# Altium PCB Stepper Board-v1.0.PcbDoc (part 6 of 8)
Units mil, origin at the board's own origin, x right, y up, seen from the top; angles counter-clockwise.
Board outline 6225.19 x 6531 mil, 4 copper layers (Top Layer, Layer-1, Layer-2, Bottom Layer), stack 61.654 mil thick; 410 components, 372 nets, 1464 pads, 1083 vias.
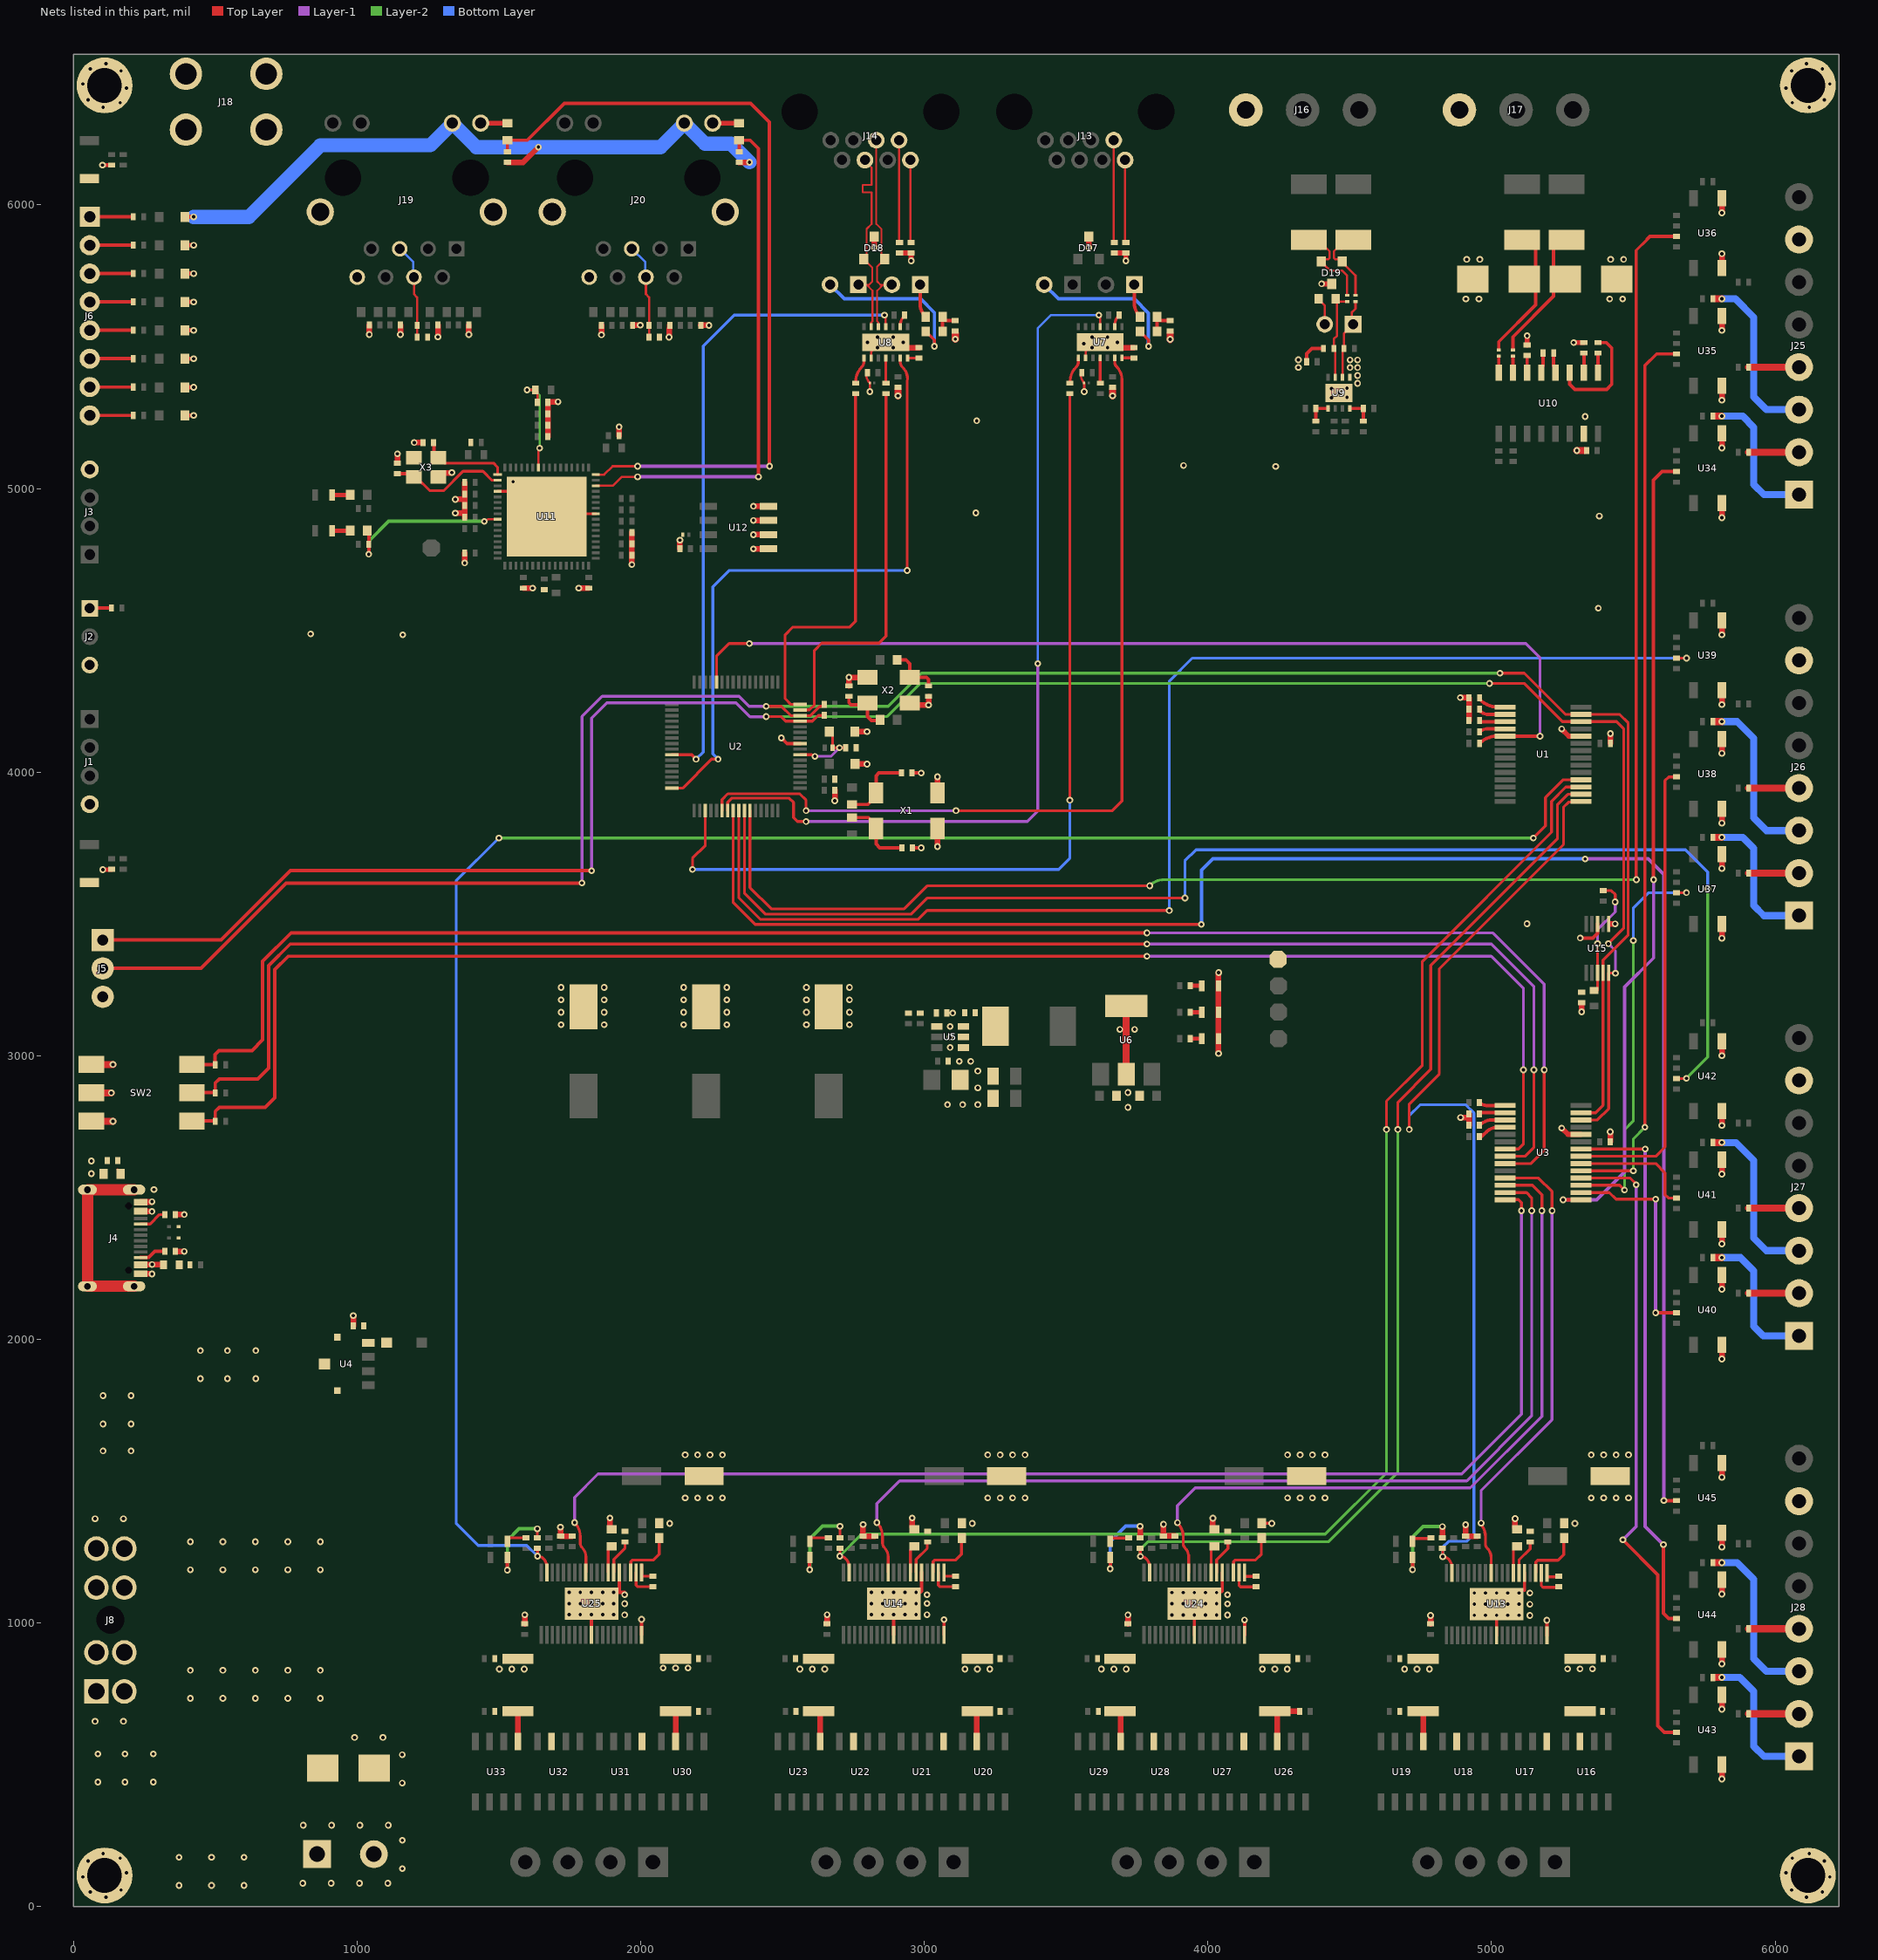
[diagram p5: the nets of this part, all layers, seen from the top]

## Via types
v1: diameter 23.62, hole 11.81, Top Layer to Bottom Layer, 1081 vias
v2: diameter 23.62, hole 11.81, Top Layer to Bottom Layer, tented both sides, 2 vias

## Nets (pads, with @x,y where several pads share a name; then routed paths per layer and width w, separated by ;. In a path a pad name is that pad's centre, name@x,y a point inside that pad or via, vN(x,y) a via of type N, cw(c..) or ccw(c..) an arc to the next point about the centre after c; other vN are vias at no path point) (continued)
CAN1_TX: R45.2 U2.51 | length 3211.9
  Top Layer w10: v1(2182.45,3657) 2182.45,3696.46 2227.73,3741.73 U2.51@2227.73,3864.63 ; v1(3513,3901) R45.2@3513,5334.77
  Bottom Layer w10: v1(2182.45,3657) 3474,3657 3513,3696 v1(3513,3901)
CAN2_N: D18.2 J12.2 J14.5 U8.12 | length 736.2
  Top Layer w6.5: 2830.57,6107.49 J14.5@2830.57,6228.51
  Top Layer w6.66: 2830.65,6107.41 2830.65,5933 2849.12,5914.53 D18.2@2849.12,5820.54 ; U8.12@2838.32,5570.61 2838.32,5585.75 2833.76,5590.31 2833.76,5698.11 2854.64,5718.98 ; D18.2@2849.98,5820.54 D18.2@2860.91,5809.61 2833.16,5781.87 2833.16,5730.94 2845.12,5718.98 2854.64,5718.98 ; J12.2@2884.36,5718.98 2854.64,5718.98
CAN2_P: D18.1 J11.1 J14.4 U8.13 | length 736.2
  Top Layer w6.5: J14.4@2790.53,6155.47 2814.07,6131.93 2814.07,6107.49
  Top Layer w6.66: J11.1@2766.5,5718.98 J11.1@2796.22,5718.98 ; D18.1@2796.17,5820.54 2796.17,5915.18 2813.99,5933 2813.99,6041 2813.99,6044.33 2782.5,6044.33 2782.5,6071 2813.99,6071 2813.99,6089 2813.99,6107.41 ; D18.1@2797.03,5820.54 D18.1@2786.1,5809.61 2816.5,5779.22 2816.5,5729.74 2805.75,5718.98 J11.1@2796.22,5718.98 ; U8.13@2812.73,5570.61 2812.73,5585.75 2817.1,5590.12 ; 2817.1,5590.17 ccw(c2833.76,5590.31) 2817.1,5590.12 ; J11.1@2796.22,5718.98 2817.1,5698.11 2817.1,5590.12
CAN2_RX: R46.2 U2.15 | length 1373.8
  Top Layer w10: U2.15@2562.37,4218.95 2563.28,4219.86 2594.86,4219.86 2612,4237 2612,4429 2638,4455 2840,4455 2864.92,4479.92 R46.2@2864.92,5330.63
CAN2_TX: R47.2 U2.16 | length 1353.9
  Top Layer w10: U2.16@2562.37,4238.64 2529.36,4238.64 2509,4259 2509,4485 2535,4511 2736,4511 2757.02,4532.02 R47.2@2757.02,5330.63
"CHASIS GND": "J19.Shield 1" "J19.Shield 2" "J20.Shield 1" "J20.Shield 2" J18.1 J19.8 J20.8 pad.MH1
  other v1: 114.33,32.27 6110.86,32.27 58.42,51.29 6166.77,51.29 167.31,58.36 6057.88,58.36 32.33,104.27 6192.86,104.27 186.3,118.67 6038.89,118.67 51.35,160.18 6173.84,160.18 164.24,170.25 6060.95,170.25 104.33,186.27 6120.86,186.27 104.33,6344.73 6120.86,6344.73 164.24,6360.75 6060.95,6360.75 51.35,6370.82 6173.84,6370.82 186.3,6412.33 6038.89,6412.33 32.33,6426.73 6192.86,6426.73 167.31,6472.64 6057.88,6472.64 58.42,6479.71 6166.77,6479.71 114.33,6498.73 6110.86,6498.73
DIR+_1: J25.4 NT18.2 | length 177.5
  Top Layer w25: NT18.2@5906.89,5428.29 J25.4@6084.39,5428.29
DIR+_2: J27.4 NT24.2 | length 177.5
  Top Layer w25: NT24.2@5906.89,2462.63 J27.4@6084.39,2462.63
DIR+_3: J26.4 NT21.2 | length 177.5
  Top Layer w25: NT21.2@5906.89,3943.96 J26.4@6084.39,3943.96
DIR+_4: J28.4 NT27.2 | length 177.5
  Top Layer w25: NT27.2@5906.89,979.29 J28.4@6084.39,979.29
DIR-1: U3.25 U13.11 | length 1644.9
  Top Layer w10: v1(4963.12,1352.02) 4962.91,1352.02 4960.68,1349.79 cw(c4909.76,1303.25) 4978.74,1303.25 4978.74,1278.22 ccw(c4998.92,1278.22) 4984.65,1263.95 cw(c4951.4,1230.7) 4998.43,1230.7 U13.11@4998.43,1176.5 ; U3.25@5047.97,2568.73 5166.28,2568.73 5213.64,2521.36 v1(5213.64,2453.29)
  Layer-1 w10: v1(4963.12,1352.02) 4963.12,1466.12 5213.64,1716.64 v1(5213.64,2453.29)
DIR-2: U3.26 U24.11 | length 2586.8
  Top Layer w10: v1@3892.57,1353.32 cw(c3843.76,1304.57) 3912.74,1304.57 3912.74,1279.55 ccw(c3932.92,1279.55) 3918.65,1265.28 cw(c3885.4,1232.02) 3932.43,1232.02 U24.11@3932.43,1177.82 ; U3.26@5047.97,2543.13 5143.87,2543.13 5177.67,2509.33 v1(5177.67,2453.29)
  Layer-1 w10: v1(3892.54,1353.35) 3892.54,1413.54 3955,1476 4925,1476 5177.67,1728.67 5177.67,2451.33 v1@5176,2453
DIR-3: U3.27 U14.11 | length 3560.7
  Top Layer w10: v1@2832.57,1353.97 cw(c2783.76,1305.23) 2852.74,1305.23 2852.74,1280.2 ccw(c2872.92,1280.2) 2858.65,1265.93 cw(c2825.4,1232.67) 2872.43,1232.67 U14.11@2872.43,1178.47 ; U3.27@5047.97,2517.54 5123.46,2517.54 5141.69,2499.31 v1(5141.69,2453.29)
  Layer-1 w10: v1(2832.54,1354) 2832.54,1420.39 2913.15,1501 4913,1501 5141.69,1729.69 v1(5141.69,2453.29)
DIR-4: U3.28 U25.11 | length 4543.7
  Top Layer w10: v1@1766.57,1353.97 cw(c1717.76,1305.23) 1786.74,1305.23 1786.74,1280.2 ccw(c1806.92,1280.2) 1792.65,1265.93 cw(c1759.4,1232.67) 1806.43,1232.67 U25.11@1806.43,1178.47 ; U3.28@5047.97,2491.95 5049.02,2493 5095,2493 5105.71,2482.29 v1(5105.71,2453.29)
  Layer-1 w10: v1(1766.54,1354) 1766.54,1442.54 1849,1525 4895.6,1525 5106,1735.4 v1@5106,2452
DIR-_1: J25.3 R139.2 | length 620.9
  Top Layer w25: 5789.89,5668.79 v1(5812.39,5668.79)
  Bottom Layer w25: v1(5812.39,5668.79) 5860.21,5668.79 5925,5604 5925,5323 5969.71,5278.29 J25.3@6084.39,5278.29
DIR-_2: J27.3 R157.2 | length 612.9
  Top Layer w25: 5789.89,2693.96 v1(5812.39,2693.96)
  Bottom Layer w25: v1(5812.39,2693.96) 5862.22,2693.96 5925,2631.18 5925,2357.33 5969.71,2312.63 J27.3@6084.39,2312.63
DIR-_3: J26.3 R142.2 | length 616.1
  Top Layer w25: 5789.89,4178.29 v1(5812.39,4178.29)
  Bottom Layer w25: v1@5814.59,4178.29 5866.38,4178.29 5925,4119.67 5925,3838.67 5969.71,3793.96 J26.3@6084.39,3793.96
DIR-_4: J28.3 R160.2 | length 617.1
  Top Layer w25: 5789.89,1212.63 v1(5812.39,1212.63)
  Bottom Layer w25: v1(5812.39,1212.63) 5866.05,1212.63 5925,1153.68 5925,874 5969.71,829.29 J28.3@6084.39,829.29
EN_CAN: U2.54 U7.6 | length 3086.9
  Top Layer w10: U2.54@2286.79,3864.63 2286.79,3903.23 2307.24,3923.68 2560.32,3923.68 2583,3901 v1(2583,3864.11) ; v1(3111.62,3864.11) 3663.11,3864.11 3696.77,3897.77 3696.77,5385.69 ccw(c3636.67,5385.69) 3679.17,5428.19 cw(c3698.46,5447.47) 3671.18,5447.47 U7.6@3671.18,5460.58
  Layer-1 w10: v1(2583,3864.11) v1(3111.62,3864.11)
EN_CAN_2: U2.48 U8.6 | length 2283.2
  Top Layer w10: U2.48@2109.63,3943.36 2147.55,3943.36 2249.82,4045.63 v1(2273,4045.63) ; U8.6@2915.1,5460.37 2915.1,5447.27 ccw(c2942.37,5447.27) 2923.08,5427.98 cw(c2880.59,5385.48) 2940.69,5385.48 ; v1(2939.28,4711) 2939.28,5381.55
  Bottom Layer w10: v1(2273,4045.63) 2253.98,4064.65 2253.98,4653.98 2311,4711 v1(2939.28,4711)
ENA+_1: J25.2 NT17.2 | length 177.5
  Top Layer w25: NT17.2@5906.89,5128.29 J25.2@6084.39,5128.29
ENA+_2: J27.2 NT23.2 | length 177.5
  Top Layer w25: NT23.2@5906.89,2162.63 J27.2@6084.39,2162.63
ENA+_3: J26.2 NT20.2 | length 177.5
  Top Layer w25: NT20.2@5906.89,3643.96 J26.2@6084.39,3643.96
ENA+_4: J28.2 NT26.2 | length 177.5
  Top Layer w25: NT26.2@5906.89,679.29 J28.2@6084.39,679.29
ENA-_1: J25.1 R138.2 | length 527.6
  Top Layer w25: 5789.89,5255.29 v1(5812.39,5255.29)
  Bottom Layer w25: v1(5812.39,5255.29) 5885.71,5255.29 5925,5216 5925,5014 5960.71,4978.29 J25.1@6084.39,4978.29
ENA-_2: J27.1 R156.2 | length 523.4
  Top Layer w25: 5789.89,2287.96 v1(5812.39,2287.96)
  Bottom Layer w25: v1(5812.39,2287.96) 5878.68,2287.96 5925,2241.64 5925,2045.5 5957.87,2012.63 J27.1@6084.39,2012.63
ENA-_3: J26.1 R141.2 | length 527.3
  Top Layer w25: 5789.89,3770.29 v1(5812.39,3770.29)
  Bottom Layer w25: v1(5812.39,3770.29) 5886.38,3770.29 5925,3731.67 5925,3529.67 5960.71,3493.96 J26.1@6084.39,3493.96
ENA-_4: J28.1 R159.2 | length 523
  Top Layer w25: 5789.89,807.63 v1(5812.39,807.63)
  Bottom Layer w25: v1(5812.39,807.63) 5875.67,807.63 5925,758.29 5925,565 5960.71,529.29 J28.1@6084.39,529.29
ERRLED: R95.1 R96.2 U11.9 | length 617.5
  Top Layer w8: v1@1448,4884 cw(c1466.54,4865.46) 1459.18,4890.63 cw(c1466.54,4865.46) 1466.54,4891.68 U11.9@1495.32,4891.68
  Top Layer w12: R96.2@1035.55,4851.52 1041.05,4846.02 R95.1@1041.05,4803.52 v1(1041.05,4768.5)
  Layer-2 w12: v1(1041.05,4768.5) 1041.05,4815.05 1110.34,4884.34 v1(1448.66,4884.34)
EXT_STP_DIR-_1: R127.1 U3.5 | length 3169
  Top Layer w10: U3.5@5315.68,2594.32 v1(5500.09,2594.32)
  Top Layer w12: v1(5541,2747.86) 5541,5433.39 5582.41,5474.79 R127.1@5652.39,5474.79
  Layer-2 w10: v1(5500.09,2594.32) 5500.09,2706.95 v1(5541,2747.86)
EXT_STP_DIR-_2: R145.1 U3.6 | length 432.3
  Top Layer w10: U3.6@5315.68,2619.91 5579.09,2619.91 5612,2587 5612,2509.79 5623.5,2498.29 R145.1@5652.39,2498.29
EXT_STP_DIR-_3: R130.1 U3.7 | length 1647.7
  Top Layer w10: U3.7@5315.68,2645.5 5579.5,2645.5 5612,2678 5612,3970 5625.29,3983.29 R130.1@5652.39,3983.29
EXT_STP_DIR-_4: R148.1 U3.8 | length 1943.8
  Top Layer w10: U3.8@5315.68,2671.09 v1(5542,2671.09)
  Top Layer w12: v1(5606,1276) 5606,1034 5624.21,1015.79 R148.1@5652.39,1015.79
  Layer-1 w12: v1(5542,2671.09) 5542,1340 v1(5606,1276)
EXT_STP_ENA-_1: R126.1 U3.1 | length 2898.1
  Top Layer w12: v1(5252.28,2491.95) U3.1@5315.68,2491.95 ; v1@5571.59,3619.41 5571,3620 5571,5029 5601.79,5059.79 R126.1@5652.39,5059.79
  Layer-1 w12: v1(5252.28,2491.95) 5371.1,2491.95 5469,2589.86 5469,3242 5571.59,3344.59 v1(5571.59,3620.79)
EXT_STP_ENA-_2: R144.1 U3.2 | length 746.7
  Top Layer w10: U3.2@5315.68,2517.54 5415.46,2517.54 5439,2494 v1(5579,2494)
  Top Layer w12: v1(5579,2093.79) R144.1@5652.39,2093.79
  Layer-1 w12: v1(5579,2093.79) v1(5579,2494)
EXT_STP_ENA-_3: R129.1 U3.3 | length 1412
  Top Layer w10: U3.3@5315.68,2543.13 5452.27,2543.13 v1(5469,2526.4) ; R129.1@5652.39,3574.79 5687.1,3574.79 v1(5687.31,3575)
  Layer-2 w10: v1(5469,2526.4) 5469,2738 5500,2769 v1(5500,3406)
  Bottom Layer w10: v1(5500,3406) 5500,3520.31 5554.69,3575 v1(5687.31,3575)
EXT_STP_ENA-_4: R147.1 U3.4 | length 2260.8
  Top Layer w10: U3.4@5315.68,2568.73 5489.28,2568.73 v1@5513,2545
  Top Layer w12: v1(5463,1293) 5586.71,1169.29 5586.71,637.29 5609.71,614.29 R147.1@5652.39,614.29
  Layer-1 w12: v1(5463,1293) 5510,1340 v1(5510,2545)
EXT_STP_PUL-_1: R128.1 U2.59 | length 5852.9
  Top Layer w10: U2.59@2385.21,3864.63 2385.21,3592.79 2460,3518 2929,3518 3010,3599 v1(3795,3599) ; v1(5511,3620.79) 5510,3621.79 5510,5840 5549.79,5879.79
  Top Layer w12: 5549.79,5879.79 5558.79,5888.79 R128.1@5652.39,5888.79
  Layer-2 w10: v1@3792,3600 3795,3600 cw(c3845.2,3549.81) 3845.2,3620.79 v1(5511,3620.79)
EXT_STP_PUL-_2: R146.1 U2.58 | length 4715.5
  Top Layer w10: U2.58@2365.53,3864.63 2365.53,3573.68 2440.21,3499 2953,3499 3010,3556 v1(3919,3556) ; R146.1@5652.39,2919.79 v1@5687.1,2919.79
  Layer-2 w10: v1(5687.31,2920) 5762.39,2995.08 v1(5762.39,3588.26)
  Bottom Layer w10: v1(3919,3556) 3919,3687 3958,3726 5684.23,3726 5762.39,3647.84 v1(5762.39,3588.26)
EXT_STP_PUL-_3: R131.1 U2.57 | length 4571.9
  Top Layer w10: U2.57@2345.84,3864.63 2345.84,3556.37 2421.21,3481 2979,3481 3010,3512 v1(3864,3512) ; R131.1@5652.39,4401.79 5687.35,4401.79 v1(5687.56,4402)
  Bottom Layer w10: v1(3864,3512) 3864,4321.07 3944.93,4402 v1(5687.56,4402)
EXT_STP_PUL-_4: R149.1 U2.56 | length 6120.8
  Top Layer w10: U2.56@2326.16,3864.63 2326.16,3540.05 2403.21,3463 v1(3977,3463)
  Top Layer w12: v1(5608,1431.29) R149.1@5652.39,1431.29
  Layer-1 w12: v1(5329.95,3694) 5553,3694 5608,3639 v1(5608,1431.29)
  Bottom Layer w12: v1(3977,3463) 3977,3654 4017,3694 4137,3694 v1(5329.95,3694)
FLT-1: R99.2 U1.1 U13.18 | length 3487.5
  Top Layer w10: v1(4710,2740) 4710,2830 4816,2936 4816,3307 5254,3745 5254,3877.07 5271.32,3894.39 5313.56,3894.39 U1.1@5315.68,3896.52 ; R99.2@4826.96,1261.67 cw(c4824.8,1259.52) 4827.85,1259.52 v1(4827.85,1233.52) ; v1@4827.91,1233.52 cw(c4827.91,1204.7) 4848.29,1225.08 cw(c4818.5,1195.29) 4860.64,1195.29 U13.18@4860.64,1176.5
  Bottom Layer w10: v1(4710,2740) 4710,2789 4748,2827 4909.6,2827 4938.31,2798.29 4938.31,1314.21 4911.6,1287.5 4848.53,1287.5 4827.85,1266.82 v1(4827.85,1233.52)
FLT-2: R114.2 U1.2 U24.18 | length 3835.2
  Top Layer w10: R114.2@3760.96,1263 cw(c3758.8,1260.84) 3761.85,1260.84 v1(3761.85,1234.85) ; v1@3761.91,1234.85 cw(c3761.91,1206.02) 3782.29,1226.41 cw(c3752.5,1196.61) 3794.64,1196.61 U24.18@3794.64,1177.82 ; v1(4669.84,2740) 4669.84,2835.84 4786,2952 4786,3319 5232.71,3765.71 5232.71,3886 ; 5233,3886 5269.11,3922.11 U1.2@5315.68,3922.11
  Layer-2 w10: v1(3761.85,1234.85) 3761.85,1259.85 3788,1286 4425,1286 4669.84,1530.84 v1(4669.84,2740) 4669.84,2740.84 v1@4670,2741
FLT-3: R101.2 U1.3 U14.18 | length 4886.3
  Top Layer w10: v1(2701.85,1235.5) ccw(c2700.21,1237.15) 2702.53,1237.15 R101.2@2702.53,1263 ; v1@2701.91,1235.5 cw(c2701.91,1206.67) 2722.29,1227.06 cw(c2692.5,1197.26) U14.18@2734.64,1197.26 ; U14.18@2734.64,1179.15 U14.18@2734.64,1197.94 ; v1(4629.68,2740) 4629.68,2839.68 4756,2966 4756,3333 5211.43,3788.43 5211.43,3897.43 5261.7,3947.7 U1.3@5315.68,3947.7
  Layer-2 w10: v1(2701.85,1235.5) 2779.35,1313 4414,1313 4629.68,1528.68 v1(4629.68,2740)
FLT-4: R116.2 U1.4 U25.18 | length 6875.5
  Top Layer w10: R116.2@1635.53,1263 1635.85,1262.68 v1(1635.85,1235.5) 1635.91,1235.5 cw(c1635.91,1206.67) 1656.29,1227.06 cw(c1626.5,1197.26) 1668.64,1197.26 U25.18@1668.64,1178.47 ; v1(5147.57,3767.71) 5190.14,3810.29 5190.14,3910.14 5253.29,3973.29 U1.4@5315.68,3973.29
  Layer-2 w10: v1(1500,3767.71) v1(5147.57,3767.71)
  Bottom Layer w10: v1(1500,3767.71) 1349,3616.71 1349,1351 1426.54,1273.46 1597.89,1273.46 v1(1635.85,1235.5)
GND: C1.1 C2.1 C3.1 C4.2 C5.1 C6.1 C7.1 C8.1 C9.1 C10.1 C11.1 C12.2 C13.2 C14.2 C15.1 C16.1 C19.1 C20.1 C21.1 C22.1 C23.2 C24.1 C25.2 C26.1 C27.2 C28.2 C29.1 C30.1 C31.1 C34.1 C35.1 C36.1 C37.1 C38.1 C39.1 C40.1 C41.1 C42.1 C43.1 C44.1 C45.1 C46.1 C47.1 C48.1 C49.1 C50.1 C51.1 C52.1 C53.1 C54.1 C55.1 C56.1 C57.1 C58.1 C59.1 C60.1 C61.1 C62.1 C63.1 C64.2 C65.2 C66.1 C67.1 C70.2 C71.2 C72.2 C73.2 C76.1 C77.1 C78.2 C79.2 C80.2 C81.1 C82.1 C85.2 C86.2 C87.2 C88.2 C91.1 C92.1 D1.2 D2.2 D3.2 D4.2 D5.2 D6.2 D7.2 D8.2 D9.2 D10.2 D11.2 D12.2 D14.1 D15.2 D16.2 D17.3 D18.3 D19.3 D20.1 D21.1 J1.4 J2.3 J3.4 J4.A1/B12 J4.B1/A12 J5.3 J7.2 J16.3 J17.3 J19.10 J20.10 J25.7 J26.7 J27.7 J28.7 LED1.2 LED2.2 LED3.2 NT2.2 NT4.2 NT6.2 NT8.2 NT10.2 NT12.2 NT14.2 NT16.2 R9.2 R10.2 R11.2 R14.2 R15.2 R16.2 R19.2 R20.2 R34.1 R36.1 R40.1 R41.1 R52.1 R53.1 R54.1 R55.1 R62.2 R74.1 R75.1 R82.2 R93.1 R94.1 R103.1 R104.1 R105.1 R106.1 R108.1 R109.1 R110.1 R111.1 R118.1 R119.1 R120.1 R121.1 R122.1 R123.1 R124.1 R125.1 SW1.1 SW2.4 SW2.5 SW2.6 SW3.1 TP4.1 U1.10 U2.9 U3.10 U5.4 U6.2 U6.4 U7.2 U7.15 U8.2 U8.15 U9.5 U9.9 U10.15 U11.4 U11.41 U11.65 U12.1 U12.2 U12.3 U12.4 U13.5 U13.29 U13.38 U13.39 U14.5 U14.29 U14.38 U14.39 U15.1 U15.3 U24.5 U24.29 U24.38 U24.39 U25.5 U25.29 U25.38 U25.39 U34.2 U34.3 U35.2 U35.3 U36.2 U36.3 U37.2 U37.3 U38.2 U38.3 U39.2 U39.3 U40.2 U40.3 U41.2 U41.3 U42.2 U42.3 U43.2 U43.3 U44.2 U44.3 U45.2 U45.3 X1.2 X1.3 X2.2 X2.4 X3.2 X3.4 | length 10293.6
  Top Layer w8: C25.2@2795.5,5402.53 ccw(c2838.61,5402.53) D16.2@2808.13,5372.05 v1(2808.13,5341.79) ; U8.2@2812.73,5460.37 2812.73,5482.76 U8.15@2845.46,5515.49 ; X1.3@3046.27,3912.06 X1.3@3046.27,3926.99 ; C23.2@3551.59,5402.74 ccw(c3594.69,5402.74) D15.2@3564.21,5372.26 ; v1(3563.73,5341.79) D15.2@3563.73,5372.05 ; U7.2@3568.82,5460.58 3568.82,5482.97 3601.54,5515.69 U7.15@3620,5515.69
  Top Layer w10: U11.4@1495.32,4990.11 1579.97,4990.11 U11.65@1668.55,4901.52 ; v1(1550,5024) 1668.55,4905.45 U11.65@1668.55,4901.52 ; U11.41@1841.78,4911.36 1678.39,4911.36 U11.65@1668.55,4901.52
  Top Layer w12: U25.29@1826.12,957.5 U25.29@1826.12,958 U25.39@1826.12,1067.73 ; U25.5@1924.54,1178.47 1924.54,1107.36 1943.23,1107.36 v1(1943.23,1099.38) ; U25.38@2002.78,959 v1(2002.78,1012.15) ; v1(2496,4120.53) 2515.69,4100.84 U2.9@2562.37,4100.84 ; U14.29@2892.12,958.18 U14.39@2892.12,1068.41 ; C3.1@2957.5,3733 v1(2989.19,3733) ; C4.2@2957.7,3997 v1(2989,3997) ; 2988,1109 2990.54,1111.54 U14.5@2990.54,1178.47 ; U14.38@3069.28,958.68 v1(3069.28,1011.82) ; U24.29@3952.12,957.35 v1(3952.11,1067.59) ; 4049,1110 4050.54,1111.54 U24.5@4050.54,1177.82 ; U24.38@4129.28,957.35 v1(4129.28,1010.5) ; C91.1@4189.56,1352 4190.06,1351.5 4224.42,1351.5 v1(4224.92,1350.99) ; C29.1@4348.26,5447.24 4348.26,5475.61 4366.76,5494.11 R62.2@4407.26,5494.11 ; U13.29@5018.12,956.02 U13.39@5018.12,1065.76 ; 5115,1116 5115.19,1116 5116.54,1117.35 U13.5@5116.54,1176.5 ; U13.38@5195.28,956.02 v1(5195.28,1009.17) ; v1(5312.79,3415) 5356.89,3415 5373.7,3431.81 5373.7,3465.14 U15.3@5373.79,3465.23
  Top Layer w15: SW3.1@56.49,6093.09 SW3.1@57,6093.6 ; v1(102,6140.5) C40.1@133,6140.5 ; v1(102.99,3656.32) C11.1@133.99,3656.32 ; D3.2@392.28,5258 v1(423.28,5258) ; D4.2@392.26,5357 v1(423.26,5357) ; D5.2@392.27,5458 v1(423.27,5458) ; D6.2@392.27,5558 v1(423.27,5558) ; D7.2@392.27,5658 v1(423.27,5658) ; D8.2@392.27,5758 v1(423.27,5758) ; D9.2@392.27,5858 v1(423.27,5858) ; D11.2@392.27,5958 v1(423.27,5958)
  Top Layer w18: R54.1@2913.65,5830.48 R55.1@2953.51,5830.48 ; v1@2953.51,5803.15 R55.1@2953.51,5830.48 ; R55.1@2957.01,5830.48 R55.1@2953.51,5830.48 ; R52.1@3669.65,5830.48 R53.1@3710.65,5830.48 3710.81,5830.48 3710.81,5803.15 v1(3710.98,5802.98) ; v1(4401,5722) 4401.13,5721.87 D19.3@4436.76,5721.87 ; C31.1@5125.76,5506.08 v1(5125.76,5539.08) ; v1(5247.39,2744.81) 5269.79,2722.41 5315.54,2722.41 U3.10@5315.68,2722.27 ; v1(5247.39,4152.43) 5272.84,4126.98 U1.10@5288.27,4126.98 ; v1(5289.76,5514.74) C30.1@5325.76,5514.74
  Top Layer w20: J4.B1/A12@236.01,2231.29 v1@275.52,2231.29 ; J4.A1/B12@236.01,2483.26 236.98,2484.23 274.48,2484.23 275.52,2485.28 v1(276.5,2485.28) ; 367.87,2310 v1(390.37,2310) ; 367.87,2439.95 v1(390.37,2439.95) ; R34.1@986.5,2047 v1(986.5,2083.5) ; v1(1042.81,5543.08) C54.1@1042.81,5576.67 ; C38.1@1141.9,5092.06 v1(1141.9,5122.36) ; v1(1152.55,5543.09) C56.1@1152.55,5576.68 ; v1(1201.27,5162.21) C35.1@1231.57,5162.21 ; v1(1284.81,5534.61) C58.1@1284.81,5576.68 ; X3.4@1286.56,5041.38 1300.18,5055 1331.48,5055 1332.75,5056.27 v1(1333.73,5056.27) ; v1(1346.4,4913.63) 1376.7,4913.63 ; v1(1346.4,4961.93) 1376.7,4961.93 ; v1(1379.05,4737.7) C47.1@1379.05,4773 ; R74.1@1379.05,4896.12 R74.1@1379.05,4899.12 C51.1@1379.05,4939.92 C48.1@1379.05,4980.72 C52.1@1379.05,5021.52 ; v1(1393.81,5543.09) C60.1@1393.81,5576.68 ; R93.1@1530,6150.5 1585.5,6150.5 v1(1639,6204) ; R125.1@1566,872.52 R125.1@1567,873.52 ; C43.1@1586.56,4648.85 v1(1618.86,4648.85) v1@1620.86,4648.85 ; C86.2@1591,996.65 v1(1591,1028.37) ; C41.1@1672.5,5183 C42.1@1672.5,5223 R75.1@1672.5,5263 C39.1@1672.5,5304 ; C39.1@1672.5,5306 v1@1700.81,5306 ; R121.1@1717,1310.13 v1(1717,1337.93) ; R121.1@1717.6,1306 R120.1@1758.13,1306 ; v1(1781.25,4648.85) C45.1@1815.55,4648.85 ; v1(1861.5,5541.96) C55.1@1861.5,5575.55 ; C82.1@1891.28,1338.39 v1(1891.28,1369.83) ; C36.1@1923.5,5186 v1(1923.5,5217.48) ; v1@1968.5,4732 C49.1@1968.5,4765 ; C46.1@1968.5,4805 C50.1@1968.5,4845 ; C49.1@1968.68,4765 C46.1@1968.68,4805 ; C57.1@1972.24,5575.93 1997.99,5575.93 v1(1998.38,5576.31) ; v1(2100,5534) 2100,5564.27 2101.5,5565.77 2101.5,5574.55 C59.1@2102.5,5575.55 ; R124.1@2122.52,873.52 R124.1@2123.52,872.52 ; C53.1@2138.06,4787.52 v1(2138.06,4817.82) ; C61.1@2211.5,5575.55 v1(2240.51,5575.54) ; R94.1@2347,6150.5 v1(2383.5,6150.5) ; v1(2397.55,4787.52) U12.1@2450.85,4787.52 ; v1(2397.55,4837.52) U12.2@2450.85,4837.52 ; v1(2397.55,4887.52) U12.3@2450.85,4887.52 ; v1(2397.55,4937.52) U12.4@2450.85,4937.52 ; R111.1@2626,872.52 R111.1@2627,873.52 ; C71.2@2657,997.33 v1(2657,1029.04) ; v1@2684.5,3899.11 C8.1@2684.5,3936.11 ; C2.1@2734.07,4304.51 v1(2734.07,4334.3) X2.2@2799.57,4334.3 ; D1.2@2761.18,4143 v1@2798.18,4143 ; D2.2@2761.21,4028.48 v1@2798.21,4028.48 ; 2784,1315 v1(2784,1346.93) ; R106.1@2784.6,1306 R105.1@2825.13,1306 ; v1(2823.51,5848.98) D18.3@2823.51,5888.35 ; U8.15@2881.48,5496.72 v1(2890.28,5496.72) R41.1@2981.51,5496.72 ; X2.4@2949.17,4243.75 2955.71,4237.22 3014.29,4237.22 v1(3014.99,4236.52) C1.1@3014.99,4266.32 ; C67.1@2957.28,1338.39 v1(2957.28,1369.83) ; v1@3046.27,3742.9 3046.88,3737.98 3047,3737 3046.99,3737.91 X1.2@3046.27,3801.01 ; X1.3@3046.27,3926.99 v1(3046.27,3983.5) ; R110.1@3187,873.52 R110.1@3188,872.52 ; v1(3579.65,5848.98) D17.3@3579.65,5888.35 ; U7.15@3620,5515.69 3638.97,5496.72 3681.25,5496.72 R40.1@3739,5496.72 ; C85.2@3718,996.5 v1(3718,1028.22) ; 3843.26,1315 v1(3843.26,1347.7) ; R119.1@3843.86,1306.78 R118.1@3884.39,1306.78 ; C81.1@4017.28,1337.74 v1(4017.28,1369.18) ; v1@4038,3008 4037.53,3008.47 LED1.2@4037.53,3060 LED2.2@4037.53,3153.27 LED3.2@4037.53,3246.54 4037.53,3292.53 v1(4038,3293) ; C70.2@4785,996.5 v1(4785,1026.39) ; v1(4890,4263) R9.2@4919.69,4263 ; v1(4891,2782.21) R14.2@4920.39,2782.21 ; v1(4908.92,1346.38) 4909.26,1346.38 R104.1@4909.26,1313.68 ; R104.1@4909.86,1305.45 R103.1@4950.39,1305.45 ; R15.2@4920.39,2754.79 R14.2@4920.39,2782.21 ; R14.2@4920.39,2794.71 R14.2@4920.39,2782.21 ; R11.2@4920.83,4181.69 R10.2@4920.83,4221.77 R9.2@4920.83,4261.86 ; C66.1@5083.28,1336.42 v1(5083.28,1367.86) ; v1(5317.79,3154.56) C78.2@5317.79,3185.12 ; C6.1@5418.89,2696.68 v1(5418.89,2731.61) ; 5419.07,3465.23 5435.77,3465.23 v1(5436,3465) ; C5.1@5419.33,4101.24 v1(5419.33,4136.17) ; v1(5812.39,449.3) U43.2@5812.39,500.23 ; v1(5812.39,695.36) U43.3@5812.39,746.29 ; v1(5812.39,855.33) U44.2@5812.39,906.26 ; v1(5812.39,1101.4) U44.3@5812.39,1152.32 ; v1(5812.39,1267.33) U45.2@5812.39,1318.26 ; v1(5812.39,1513.4) U45.3@5812.39,1564.32 ; v1(5812.39,1930.3) U40.2@5812.39,1981.23 ; v1(5812.39,2176.36) U40.3@5812.39,2227.29 ; v1(5812.39,2336.33) U41.2@5812.39,2387.26 ; v1(5812.39,2582.4) U41.3@5812.39,2633.32 ; v1(5812.39,2754.33) U42.2@5812.39,2805.26 ; v1(5812.39,3000.4) U42.3@5812.39,3051.32 ; v1(5812.39,3414.3) U37.2@5812.39,3465.23 ; v1(5812.39,3660.36) U37.3@5812.39,3711.29 ; v1(5812.39,3820.33) U38.2@5812.39,3871.26 ; v1(5812.39,4066.4) U38.3@5812.39,4117.32 ; v1(5812.39,4238.33) U39.2@5812.39,4289.26 ; v1(5812.39,4484.4) U39.3@5812.39,4535.32 ; v1(5812.39,4897.33) U34.2@5812.39,4948.26 ; v1(5812.39,5143.4) U34.3@5812.39,5194.32 ; v1(5812.39,5311.83) U35.2@5812.39,5362.76 ; v1(5812.39,5557.9) U35.3@5812.39,5608.82 ; U36.2@5812.39,5777.26 v1(5812.39,5828.19) ; v1(5812.39,5972.4) U36.3@5812.39,6023.32
  Top Layer w25: SW2.5@56.93,2869 SW2.5@62.84,2869 v1(133.09,2869) ; SW2.6@62.84,2769 v1(139,2769) ; SW2.4@62.84,2969 v1(139,2969) ; v1(2907.18,5327.29) C26.1@2907.18,5347.79 ; v1@3109.51,5526 C28.2@3109.51,5546.5 ; v1(3663.99,5327.29) C24.1@3663.99,5347.79 ; U6.2@3712.03,2934.93 U6.4@3712.03,3175.09 ; v1@3867,5525.69 v1(3867,5526) C27.2@3867,5546.5 ; v1(5301,5134.24) C34.1@5326.26,5134.24
  Bottom Layer w50: v1(423.27,5958) 617.63,5958 869.93,6210.31 1257.73,6210.31 J19.10@1335.84,6288.43 1420.27,6204 v1(1639,6204) 2069.4,6204 J20.10@2153.83,6288.43 2226.5,6215.76 2318.24,6215.76 v1(2383.5,6150.5)
  other v1: 1008.23,82.24 1108.23,82.24 1159.24,133.31 1159.24,233.31 1009.8,286.79 1109.8,286.79 1159.02,435.24 1159.02,535.24 991,596 1091,596 1501.34,837 1545.17,837 1589,837 2561.34,837 2605.17,837 2649,837 3624.34,837 3668.17,837 3712,837 4693.34,837 4737.17,837 4781,837 3143.34,837.04 3187.17,837.04 3231,837.04 4192.34,837.04 4236.17,837.04 4280,837.04 5268.34,838 5312.17,838 5356,838 2078.86,841 2122.69,841 2166.52,841 4939.37,1026.89 4978.74,1026.89 5018.11,1026.89 5057.48,1026.89 5096.85,1026.89 5135.23,1026.32 4069.23,1027.65 1747.37,1028.87 1786.74,1028.87 1826.11,1028.87 1865.48,1028.87 1904.85,1028.87 1943.23,1028.3 2813.37,1028.87 2852.74,1028.87 2892.11,1028.87 2931.48,1028.87 2970.85,1028.87 3009.23,1028.97 3873.37,1028.22 3912.74,1028.22 3952.11,1028.22 3991.48,1028.22 4030.85,1028.22 5135.23,1065.85 4939.37,1066.26 4978.74,1066.26 5018.11,1066.26 5057.48,1066.26 5096.85,1066.26 1943.23,1067.83 3873.37,1067.59 3912.74,1067.59 3991.48,1067.59 4030.85,1067.59 4069.23,1067.18 1747.37,1068.24 1786.74,1068.24 1826.11,1068.24 1865.48,1068.24 1904.85,1068.24 2813.37,1068.24 2852.74,1068.24 2892.11,1068.24 2931.48,1068.24 2970.85,1068.24 3009.23,1068.5 3009.23,1099.38 4069.23,1099.38 4939.37,1105.63 4978.74,1105.63 5018.11,1105.63 5057.48,1105.63 5096.85,1105.63 5135.23,1105.38 3873.37,1106.96 3912.74,1106.96 3952.11,1106.96 3991.48,1106.96 4030.85,1106.96 1747.37,1107.61 1786.74,1107.61 1826.11,1107.61 1865.48,1107.61 1904.85,1107.61 2813.37,1107.61 2852.74,1107.61 2892.11,1107.61 2931.48,1107.61 2970.85,1107.61 2102,1351 3169,1351 5293.99,1350.99 2156.61,1440.52 2200.44,1440.52 2244.27,1440.52 2288.1,1440.52 3223.61,1440.52 3267.44,1440.52 3311.27,1440.52 3355.1,1440.52 4281.04,1440.52 4324.87,1440.52 4368.7,1440.52 4412.53,1440.52 5351.61,1440.52 5395.44,1440.52 5439.27,1440.52 5483.1,1440.52 2156.61,1592.52 2200.44,1592.52 2244.27,1592.52 2288.1,1592.52 3223.61,1592.52 3267.44,1592.52 3311.27,1592.52 3355.1,1592.52 4281.04,1592.52 4324.87,1592.52 4368.7,1592.52 4412.53,1592.52 5351.61,1592.52 5395.44,1592.52 5439.27,1592.52 5483.1,1592.52 276.5,2230.31 62.84,2584 62.84,2629 3718.03,2818.01 3081.86,2827.52 3135.11,2827.52 3188.36,2827.52 3718.03,2870.01 3188.36,2886.77 3188.36,2946.01 3123.03,2980.01 3163.53,2980.01 4037.53,3008 3091.03,3029.11 3091.03,3066.01 3689.56,3092.91 3741.56,3092.91 3091.03,3103.41 1719,3109.37 1871,3109.37 2151.5,3109.37 2303.5,3109.37 2584,3109.37 2736,3109.37 3100.03,3150.51 1719,3153.2 1871,3153.2 2151.5,3153.2 2303.5,3153.2 2584,3153.2 2736,3153.2 1719,3197.03 1871,3197.03 2151.5,3197.03 2303.5,3197.03 2584,3197.03 2736,3197.03 1719,3240.86 1871,3240.86 2151.5,3240.86 2303.5,3240.86 2584,3240.86 2736,3240.86 5125.39,3465.23 3046.27,3737.9 2684.35,3899.11 2798.21,4028.32 2798.18,4142.85 1160.73,4484.25 835.92,4487.59 5376.65,4578.19 1968.68,4731.7 5380,4903 3181.65,4914.19 4239,5078 3914.19,5081.35 3185,5239 5330.26,5254 1708.19,5306 4435.6,5320.43 4490.6,5321.43 4463.6,5338.63 4435.6,5352.63 4490.6,5353.63 4527.78,5370.67 4527.78,5398.67 4501.36,5426.67 4527.78,5426.67 4318.76,5427.24 4501.36,5453.67 4527.78,5453.67 4318.76,5454.24 2835.28,5496.72 3591.37,5496.93 3646.37,5496.93 3562.73,5510.55 2799.28,5515.72 2925.17,5515.72 3681.25,5515.93 3109.51,5527 2835.28,5533.72 2890.28,5533.72 3591.37,5533.93 3646.37,5533.93 4909.52,5668.48 4955.52,5668.48 5416.62,5668.48 5462.62,5668.48 2953.67,5802.98 4912.9,5808 4958.9,5808 5420,5808 5466,5808
  other v2: 283.5,2528.28
GND_A-1: NT1.2 R108.2 U16.3 U17.1
GND_A-2: NT9.2 R122.2 U26.3 U27.1 | length 189.8
  Top Layer w20: U26.3@4244,581.3 4244,669.17 ccw(c4216.69,669.17) R122.2@4236,688.48 NT9.2@4316.5,688.48
GND_A-3: NT5.2 R110.2 U20.3 U21.1 | length 104.2
  Top Layer w20: U20.3@3185,581.3 R110.2@3185,685.48
GND_A-4: NT13.2 R124.2 U30.3 U31.1 | length 104.7
  Top Layer w20: R124.2@2122.52,685.48 2123,685.48 U30.3@2123,581.3
GND_B-1: NT3.2 R109.2 U18.3 U19.1 | length 104.2
  Top Layer w20: U19.1@4760,581.3 R109.2@4760,685.48
GND_B-2: NT11.2 R123.2 U28.3 U29.1 | length 108.4
  Top Layer w20: R123.2@3687,685.48 R123.2@3690,688.48 ; U29.1@3692,581.3 R123.2@3692,685.48
GND_B-3: NT7.2 R111.2 U22.3 U23.1 | length 104.2
  Top Layer w20: U23.1@2633,581.3 R111.2@2633,685.48
GND_B-4: NT15.2 R125.2 U32.3 U33.1 | length 104.2
  Top Layer w20: U33.1@1567,581.3 R125.2@1567,685.48
I2C3_SCL: J5.1 R17.1 U1.12 U2.13 U3.12 U15.10 | length 7890.7
  Top Layer w10: v1(2442.18,4196.04) 2494.78,4196.04 2511.24,4179.58 U2.13@2562.37,4179.58 2605.28,4179.58 2625.7,4200 R17.1@2647.5,4200 ; v1(4993,4313) 5115.49,4313 5250.47,4178.02 U1.12@5315.68,4178.02 5440.98,4178.02 5466,4153 5466,3449 v1(5412,3395) ; U3.12@5315.68,2773.45 5373.45,2773.45 5413.16,2813.16 U15.10@5413.16,3292.01 ; U15.10@5415,3292 5436,3292 v1(5437,3291)
  Top Layer w12: J5.1@103,3408 520,3408 764.5,3652.5 v1(1826.66,3652.5)
  Layer-1 w10: v1(1826.66,3652.5) 1826.66,4190.97 1880.23,4244.55 2336.21,4244.55 2385.71,4195.04 v1@2442.18,4195.04 ; v1(5412,3395) 5437,3370 v1(5437,3291)
  Layer-2 w10: v1(2442.18,4196.04) 2869.04,4196.04 2986,4313 v1(4993,4313)
I2C3_SDA: J5.2 R18.1 U1.13 U2.14 U3.13 U15.9 | length 7965.4
  Top Layer w10: v1(2442.18,4232.18) 2496,4232.18 2528.91,4199.27 U2.14@2562.37,4199.27 2598.77,4199.27 2631.64,4232.14 2643.5,4232.14 2644.5,4233.14 R18.1@2644.5,4239 ; v1(5030,4349) 5115.68,4349 5261.07,4203.61 U1.13@5315.68,4203.61 5451.58,4203.61 5482,4173.19 5482,3426 5393.48,3337.48 U15.9@5393.48,3292.01 5393.48,2825.48 5367,2799 5359,2799 ; U3.13@5315.68,2799.04 5359,2799.04
  Top Layer w12: J5.2@103,3308 449,3308 750,3609 v1(1792.55,3609)
  Layer-1 w10: v1(1792.55,3609) cw(c1794.1,3609.1) 1792.55,3609.1 1792.55,4196.12 1864.17,4267.75 2346.74,4267.75 2382.31,4232.18 v1(2442.18,4232.18)
  Layer-2 w10: v1(2442.18,4232.18) 2873.18,4232.18 2990,4349 v1(5030,4349)
ID0: R32.1 SW2.1 U3.21 | length 5888
  Top Layer w10: U3.21@5047.97,2671.09 5094.54,2671.09 5112.71,2689.26 v1(5112.71,2950)
  Top Layer w12: SW2.1@417.17,2770 R32.1@498.5,2770 ; R32.1@499.5,2769 499.5,2803.5 514,2818 676,2818 710,2852 710,3304 757,3351 v1(3785,3351)
  Layer-1 w10: v1(3785,3351) 4999,3351 5112.71,3237.29 v1(5112.71,2950)
ID1: R31.1 SW2.2 U3.22 | length 5925.2
  Top Layer w10: U3.22@5047.97,2645.5 5118.5,2645.5 5149.33,2676.33 v1(5149.33,2950)
  Top Layer w12: SW2.2@417.17,2870 R31.1@498.5,2870 ; R31.1@499.5,2869 499.5,2903.5 514,2918 650,2918 688,2956 688,3318 764,3394 v1(3785,3394)
  Layer-1 w10: v1(3785,3394) 5000,3394 5149.33,3244.67 v1(5149.33,2950)
ID2: R21.1 SW2.3 U3.23 | length 5961.6
  Top Layer w10: U3.23@5047.97,2619.91 5139.91,2619.91 5185.96,2665.96 v1(5185.96,2950)
  Top Layer w12: SW2.3@417.17,2969 498.5,2969 498.5,3003.5 513,3018 629,3018 667,3056 667,3333 767,3433 v1(3785,3433)
  Layer-1 w10: v1(3785,3433) 5005,3433 5185.96,3252.05 v1(5185.96,2950)
INH_MASK: U2.55 U7.11 | length 3188.4
  Top Layer w8: v1(3615.5,5611.69) cw(c3604.64,5600.83) 3620,5600.83 U7.11@3620,5570.81
  Top Layer w10: U2.55@2306.47,3864.63 2306.47,3894.22 2320.26,3908 2523.96,3908 2538.75,3893.21 2538.75,3840 2552.97,3825.78 v1(2583,3825.78)
  Layer-1 w10: v1(2583,3825.78) 3362.78,3825.78 3400,3863 v1(3400,4383)
  Bottom Layer w8: v1(3400,4383) 3400,5565 3446.69,5611.69 v1(3615.5,5611.69)
INH_MASK_2: U2.42 U8.11 | length 2285.5
  Top Layer w8: v1(2859.42,5611.49) cw(c2848.55,5600.62) 2863.92,5600.62 U8.11@2863.92,5570.61
  Top Layer w12: U2.42@2109.63,4061.47 2179.16,4061.47 v1(2195,4045.63)
  Bottom Layer w10: v1(2195,4045.63) 2220.19,4070.82 2220.19,5502.19 2329.49,5611.49 v1(2859.42,5611.49)
INTB: R7.1 U1.19 U2.28 | length 3535.2
  Top Layer w10: U2.28@2267.1,4317.37 2267.1,4409.1 2311.69,4453.69 v1@2381.97,4453.69
  Top Layer w12: v1(5170.9,4126.84) U1.19@5047.97,4126.84 5018.96,4126.84 ccw(c5018.96,4040.38) R7.1@4961.12,4104.63 ; R7.1@4961.12,4104.63 ccw(c5018.96,4040.38) R7.1@4957.83,4101.51 4960.83,4104.63 R7.1@4961.12,4104.63
  Layer-1 w10: v1(2383,4453.69) 5121.31,4453.69 5170.9,4404.11 v1(5170.9,4126.84)
LEDPOL0: R89.1 R93.2 U11.48 | length 2884
  Top Layer w8: U11.48@1841.78,5049.16 1871.22,5049.16 1900.75,5078.69 v1(1989,5078.69)
  Top Layer w12: R93.2@1530,6187.5 R89.1@1530,6228.31 1600.31,6228.31 1730.42,6358.42 2387.58,6358.42 2454,6292 v1(2454,5078.69)
  Layer-1 w12: v1(1989,5078.69) v1(2454,5078.69)
LEDPOL1: R90.1 R94.2 U11.46 | length 1864.9
  Top Layer w8: U11.46@1841.78,5009.79 1901.74,5009.79 1933.33,5041.38 v1(1989,5041.38)
  Top Layer w12: R94.2@2347,6187.5 R90.1@2347,6228.31 2385.69,6228.31 2415,6199 v1(2415,5041.38)
  Layer-1 w12: v1(1989,5041.38) v1(2415,5041.38)
NetC1_2: C1.2 R4.1 X2.1 | length 192.5
  Top Layer w12: R4.1@2902,4396 R4.1@2909.64,4396 ; R4.1@2909.65,4396.01 2935.68,4396.01 2949.17,4382.51 X2.1@2949.17,4334.3 3007.97,4334.3 3015,4327.27 C1.2@3015,4304.5
NetC2_2: C2.2 R5.1 X2.3 | length 204.1
  Top Layer w12: C2.2@2734.06,4267.5 2734.06,4244.73 2741.09,4237.7 X2.3@2799.89,4237.7 ; X2.3@2785.96,4257.36 X2.3@2799.57,4243.75 2799.57,4195.54 2813.06,4182.04 R5.1@2839.09,4182.04
NetC3_2: C3.2 R2.1 X1.1 | length 259.4
  Top Layer w12: R2.1@2744.37,3840 2802.55,3840 2829.73,3812.82 X1.1@2829.73,3801.01 2829.73,3746.27 2843,3733 C3.2@2920.5,3733
NetC4_1: C4.1 R3.1 X1.4 | length 263.3
  Top Layer w12: R3.1@2744.37,3886 2800.55,3886 2829.73,3915.18 X1.4@2829.73,3926.99 2829.73,3987.16 2839.57,3997 C4.1@2919.5,3997
NetC9_2: C9.2 D1.1 L1.2 U2.7 | length 260.1
  Top Layer w10: U2.7@2562.37,4061.47 2599.88,4061.47 cw(c2599.88,4041.5) 2605.18,4060.75 cw(c2599.88,4041.5) v1(2614,4055.62) ; D1.1@2664.72,4143 2664.72,4141.03 2676.78,4128.98 L1.2@2676.78,4086 v1(2700.64,4086) C9.2@2722.5,4086
  Layer-1 w10: v1(2614,4055.62) 2670.26,4055.62 v1(2700.64,4086)
NetC10_2: C10.2 J4.S1 J4.S2 J4.S3 J4.S4 R16.1 | length 669.7
  Top Layer w40: J4.S1@213.57,2187 J4.S2@49,2187 J4.S3@49,2527.55 J4.S4@213.57,2527.55
NetC17_1: C17.1 L2.1 U5.5
NetC17_2: C17.2 U5.6
NetC18_1: C18.1 R35.1 R36.2 U5.1
NetC27_1: C27.1 R48.2 R49.1 | length 101.1
  Top Layer w12: R48.2@3821,5554 R49.1@3821,5602.5 ; R49.1@3821,5605 R49.1@3821,5602.5 ; C27.1@3867,5592.5 3831,5592.5 R49.1@3821,5602.5
NetC28_1: C28.1 R50.2 R51.1 | length 99.6
  Top Layer w12: R50.2@3064.51,5554 R51.1@3064.51,5602.5 ; R51.1@3064.51,5605 R51.1@3064.51,5602.5 ; C28.1@3109,5592.5 3074.51,5592.5 R51.1@3064.51,5602.5
NetC30_2: C30.2 U10.2 | length 69.5
  Top Layer w12: U10.2@5325.76,5408.24 C30.2@5325.76,5477.74
NetC31_2: C31.2 U10.6 | length 60.8
  Top Layer w12: U10.6@5125.76,5408.24 C31.2@5125.76,5469.08
NetC32_1: C32.1 U10.1 | length 69.5
  Top Layer w12: U10.1@5375.76,5408.24 C32.1@5375.76,5477.74
NetC32_2: C32.2 U10.3 | length 386.8
  Top Layer w12: U10.3@5275.76,5408.24 5275.76,5368.03 5293.79,5350 5406,5350 5424,5368 5424,5495 5404.26,5514.74 C32.2@5375.76,5514.74
NetC33_1: C33.1 U10.4 | length 72.2
  Top Layer w12: C33.1@5219.26,5477.74 5219.26,5432.52 5225.76,5426.02 U10.4@5225.76,5408.24
NetC33_2: C33.2 U10.5 | length 72.2
  Top Layer w12: U10.5@5175.76,5408.24 5175.76,5426.02 5182.26,5432.52 C33.2@5182.26,5477.74
NetC35_2: C35.2 U11.1 X3.1 | length 299.9
  Top Layer w9.23: X3.1@1273.11,5120.82 1288.62,5105.31 1292.56,5105.31 X3.1@1308.17,5089.69
  Top Layer w10: X3.1@1308.17,5089.69 1480.38,5089.69 1495.32,5074.75 U11.1@1495.32,5049.16
  Top Layer w12: X3.1@1270.61,5127.32 C35.2@1270.61,5160.34
NetC38_2: C38.2 U11.2 X3.3 | length 382.7
  Top Layer w9.23: X3.3@1205.95,5038.38 X3.3@1209.88,5038.38
  Top Layer w10: X3.3@1209.88,5038.38 1255.58,4992.69 1305.23,4992.69 1373.52,5060.97 1443.3,5060.97 1474.72,5029.55 1495.24,5029.55 U11.2@1495.32,5029.48
  Top Layer w12: C38.2@1141.89,5052.71 X3.3@1174.92,5052.71
NetC39_2: C39.2 FB4.2 U11.58 | length 384
  Top Layer w8: v1(1599.01,5348) FB4.2@1628.44,5348 1635.5,5340.94 1635.5,5309.42 C39.2@1635.5,5304 ; U11.58@1639.02,5074.75 1639.02,5132.32 cw(c1653.69,5132.32) v1(1643.32,5142.69)
  Layer-2 w8: v1(1599.01,5348) 1624.5,5348 1643.32,5329.19 v1(1643.32,5142.69)
NetC62_2: C62.2 J19.4 J19.5 R87.1 | length 339.8
  Top Layer w8: J19.4@1197.97,5747.76 J19.4@1200.21,5745.51 1200.21,5685.6 1211.2,5674.61 1211.2,5534.61 C62.2@1211.5,5534.32
  Bottom Layer w8: J19.5@1150.21,5845.51 1197.97,5797.76 1197.97,5747.76 J19.4@1200.21,5745.51
NetC63_2: C63.2 J20.4 J20.5 R88.1 | length 555.5
  Top Layer w8: J20.4@2015.95,5747.76 J20.4@2018.2,5745.51 ; C63.2@2029.19,5534.32 R88.1@2029.19,5575.55 2029.19,5674.61 ; C63.2@2029.48,5534.32 2029.19,5534.61 2029.19,5674.61 ; 2018.2,5685.6 2029.19,5674.61 ; 2018.2,5685.6 J20.4@2018.2,5745.51 ; 2018.2,5685.6 J20.4@2018.2,5745.51 ; 2018.2,5685.6 2029.19,5674.61
  Bottom Layer w8: J20.5@1968.2,5845.51 2015.95,5797.76 2015.95,5747.76 J20.4@2018.2,5745.51
NetC64_1: C64.1 U13.6 | length 123.5
  Top Layer w10: U13.6@5096.86,1176.5 5096.86,1221.54 5136.23,1260.91 C64.1@5136.23,1283.65
NetC65_1: C65.1 U14.6 | length 123.5
  Top Layer w10: U14.6@2970.86,1178.47 2970.86,1223.51 3010.23,1262.88 C65.1@3010.23,1285.63
NetC66_2: C66.2 U13.7 | length 78.8
  Top Layer w10: U13.7@5077.17,1176.5 C66.2@5077.17,1255.28
NetC67_2: C67.2 U14.7 | length 78.8
  Top Layer w10: U14.7@2951.17,1178.47 C67.2@2951.17,1257.25
NetC68_1: C68.1 U13.2 | length 107.1
  Top Layer w10: U13.2@5175.6,1176.5 5175.6,1131.38 5181.45,1125.52 C68.1@5235.13,1125.52
NetC68_2: C68.2 U13.1 | length 39
  Top Layer w10: U13.1@5196.18,1162.52 C68.2@5235.13,1162.52
NetC69_1: C69.1 U14.2 | length 107.1
  Top Layer w10: U14.2@3049.6,1178.47 3049.6,1133.36 3055.45,1127.5 C69.1@3109.13,1127.5
NetC69_2: C69.2 U14.1 | length 39
  Top Layer w10: U14.1@3070.18,1164.5 C69.2@3109.13,1164.5
NetC74_1: C74.1 U13.3 | length 203.5
  Top Layer w10: U13.3@5156.39,1176.98 5156.39,1214.63 5162.25,1220.49 5234.2,1220.49 5254.56,1240.85 C74.1@5254.56,1297.68
NetC75_1: C75.1 U14.3 | length 204.6
  Top Layer w10: U14.3@3030.81,1179.38 3030.81,1215.95 3036.67,1221.81 3110.77,1221.81 3131.13,1242.17 C75.1@3131.13,1299
NetC78_1: C78.1 FB6.1 R107.1 U15.8 | length 412.6
  Top Layer w10: FB6.1@5362.79,3231.18 FB6.1@5363.79,3230.18 ; FB6.1@5373.79,3231.18 U15.8@5373.79,3292.01 v1(5373.79,3395) ; R107.1@5393.79,3582.12 5422.73,3582.12 5436,3568.85 v1(5436,3542.12)
  Layer-1 w10: v1(5373.79,3395) 5373.79,3444.79 5436,3507 v1(5436,3542.12)
NetC79_1: C79.1 U24.6 | length 123.5
  Top Layer w10: U24.6@4030.86,1177.82 4030.86,1222.86 4070.23,1262.23 C79.1@4070.23,1284.98
NetC80_1: C80.1 U25.6 | length 123.5
  Top Layer w10: U25.6@1904.86,1178.47 1904.86,1223.51 1944.23,1262.88 C80.1@1944.23,1285.63
NetC81_2: C81.2 U24.7 | length 78.8
  Top Layer w10: U24.7@4011.17,1177.82 C81.2@4011.17,1256.6
NetC82_2: C82.2 U25.7 | length 97
  Top Layer w10: U25.7@1885.17,1178.47 1885.17,1257.25 C82.2@1898.04,1270.13
NetC83_1: C83.1 U24.2 | length 107.1
  Top Layer w10: U24.2@4109.6,1177.82 4109.6,1132.71 4115.45,1126.85 C83.1@4169.13,1126.85
NetC83_2: C83.2 U24.1 | length 39
  Top Layer w10: U24.1@4130.18,1163.85 C83.2@4169.13,1163.85
NetC84_1: C84.1 U25.2 | length 107.1
  Top Layer w10: U25.2@1983.6,1178.47 1983.6,1133.36 1989.45,1127.5 C84.1@2043.13,1127.5
NetC84_2: C84.2 U25.1 | length 85.8
  Top Layer w10: U25.1@2004.18,1204.97 2003.28,1204.06 U25.1@2003.28,1178.47 2003.28,1165.41 2004.18,1164.5 C84.2@2043.13,1164.5 ; C84.2@2045.13,1167.1 C84.2@2049.13,1163.1
NetC89_1: C89.1 U24.3 | length 204.2
  Top Layer w10: U24.3@4089.91,1177.82 4090.39,1178.3 4090.39,1215.95 4096.25,1221.81 4168.2,1221.81 4188.56,1242.17 C89.1@4188.56,1299
NetC90_1: C90.1 U25.3 | length 205.9
  Top Layer w10: U25.3@1963.91,1178.47 1964.81,1179.38 1964.81,1215.95 1970.67,1221.81 2044.77,1221.81 2065.13,1242.17 C90.1@2065.13,1299
NetD13_1: D13.1 R34.2 U4.4
NetD14_2: D14.2 J7.1 J8.1 J8.2 J8.7 J8.8
  other v1: 372,74.37 486.5,74.37 601,74.37 808.23,82.24 908.23,82.24 372,173.37 486.5,173.37 601,173.37 809.8,286.79 909.8,286.79 86,439 181,439 281,439 86,538 181,538 281,538 76,653 176,653 412,734 526.5,734 641,734 755.5,734 870,734 412,833 526.5,833 641,833 755.5,833 870,833
NetD19_1: D19.1 F2.1 R66.2 | length 294.6
  Top Layer w8: F2.1@4471.16,5845.88 4502.2,5876.92 F2.1@4512.76,5876.92 ; D19.1@4474.16,5808.35 4449.39,5808.35 4444.07,5813.66 4444.07,5836.18 F2.1@4484.81,5876.92 ; D19.1@4486.19,5796.32 4486.19,5785.16 4520.33,5751.02 R66.2@4520.33,5682.74
NetD19_2: D19.2 F1.1 R65.2 | length 348.2
  Top Layer w8: F1.1@4355.76,5876.92 4365.32,5876.92 F1.1@4396.36,5845.88 ; F1.1@4388.71,5876.92 4429.45,5836.18 4429.45,5813.66 4424.13,5808.35 D19.2@4399.36,5808.35 ; D19.2@4399.36,5800.61 4399.36,5798.64 4411.5,5786.5 4413.47,5786.5 4431.04,5768.93 4472.38,5768.93 4490.97,5750.35 R65.2@4490.97,5681.56
NetD20_2: D20.2 F4.2 R68.1 | length 394.6
  Top Layer w12: 5025.76,5493.71 5025.76,5517.76 5155.65,5647.65 5155.65,5697.91 D20.2@5115.31,5738.24 ; F4.2@5107.45,5876.92 F4.2@5115.31,5869.06 ; D20.2@5156.21,5779.45 F4.2@5156.21,5847.88
NetD21_2: D21.2 F3.2 R67.1 | length 529.3
  Top Layer w12: 5075.76,5493.71 5075.76,5534.76 5219.26,5678.26 5219.26,5697.29 D21.2@5260.21,5738.24 ; D21.2@5219,5697.29 5219,5847.88 5248.04,5876.92 F3.2@5264.76,5876.92
NetFB1_1: FB1.1 J4.A4/B9 J4.B4/A9 | length 120.7
  Top Layer w20: J4.A4/B9@236.01,2451.76 v1@275.52,2451.76 ; J4.B4/A9@236.98,2263.76 276.04,2263.76 276.34,2263.46 v1(276.81,2263.93) 277.27,2263.46 316.98,2263.46 FB1.1@317.44,2263
  other v1: 276.5,2450.78
NetFB1_2: FB1.2 R22.1
NetJ2_1: J2.1 R1.1 | length 77
  Top Layer w12: J2.1@57,4577.53 57.88,4578.41 R1.1@133.62,4578.41
NetJ4_A5: J4.A5 R19.1 | length 99.7
  Top Layer w10: J4.A5@236.01,2406.49 269.72,2406.49 303.24,2440 R19.1@321.87,2440
NetJ4_B5: J4.B5 R20.1 | length 94.8
  Top Layer w12: J4.B5@236.01,2288.38 236.1,2288.47 264.85,2288.47 286.38,2310 R20.1@321.87,2310
NetJ6_1: J6.1 R23.2 | length 153.5
  Top Layer w12: J6.1@57,5958 R23.2@210.5,5958
NetJ6_2: J6.2 R24.2 | length 153.5
  Top Layer w12: J6.2@57,5858 R24.2@210.5,5858
NetJ6_3: J6.3 R25.2 | length 153.5
  Top Layer w12: J6.3@57,5758 R25.2@210.5,5758
NetJ6_4: J6.4 R26.2 | length 153.5
  Top Layer w12: J6.4@57,5658 R26.2@210.5,5658
NetJ6_5: J6.5 R27.2 | length 153.5
  Top Layer w12: J6.5@57,5558 R27.2@210.5,5558
NetJ6_6: J6.6 R28.2 | length 153.5
  Top Layer w12: J6.6@57,5458 R28.2@210.5,5458
NetJ6_7: J6.7 R29.2 | length 153.5
  Top Layer w12: J6.7@57,5358 R29.2@210.5,5358
NetJ6_8: J6.8 R30.2 | length 153.5
  Top Layer w12: J6.8@57,5258 R30.2@210.5,5258
NetJ8_3: J8.3 J8.4 J8.5 J8.6 U4.5_6 U4.7 U4.8
  other v1: 412,1187.34 526.5,1187.34 641,1187.34 755.5,1187.34 870,1187.34 412,1286.34 526.5,1286.34 641,1286.34 755.5,1286.34 870,1286.34 76,1367.34 176,1367.34 103.8,1606.43 202.8,1606.43 103.8,1701.43 202.8,1701.43 103.8,1801.43 202.8,1801.43 447.43,1861.2 542.43,1861.2 642.43,1861.2 447.43,1960.2 542.43,1960.2 642.43,1960.2
NetJ9_2: J9.2 R48.1 | length 592.2
  Top Layer w10: R48.1@3761,5554 3761,5551.5 3771,5541.5 3773.5,5541.5 3790.51,5524.49 v1(3790.51,5501.9)
  Bottom Layer w12: J9.2@3422.64,5718.98 3472.64,5668.98 3740.52,5668.98 3790.51,5618.99 v1(3790.51,5501.9)
NetJ10_1: J10.1 R49.2 | length 119.5
  Top Layer w12: J10.1@3740.51,5718.98 3740.51,5654.48 ccw(c3810.48,5654.48) 3741,5646.18 ccw(c3810.48,5654.48) R49.2@3761,5605
NetJ11_2: J11.2 R50.1 | length 573.6
  Top Layer w10: R50.1@3018.5,5541.5 3035.51,5524.49 v1(3035.51,5501.9)
  Bottom Layer w12: J11.2@2667.64,5718.98 2717.64,5668.98 2986.52,5668.98 3035.51,5620 v1(3035.51,5501.9)
NetJ12_1: J12.1 R51.2 | length 120.5
  Top Layer w12: J12.1@2984.51,5717.98 J12.1@2985.51,5718.98 2985.51,5650.87 ccw(c3050.38,5650.87) R51.2@3004.51,5605
NetJ13_7: J13.7 R52.2 | length 361.8
  Top Layer w8: J13.7@3667.89,6228.51 3667.89,5869.25 R52.2@3669.65,5867.48
NetJ13_8: J13.8 R53.2 | length 292
  Top Layer w8: J13.8@3708.04,6158.43 3708.04,5870.09 R53.2@3710.65,5867.48
NetJ14_7: J14.7 R54.2 | length 361.7
  Top Layer w8: J14.7@2910.89,6228.51 2910.89,5869.1 R54.2@2912.51,5867.48
NetJ14_8: J14.8 R55.2 | length 292
  Top Layer w8: J14.8@2951.04,6158.43 2951.04,5869.95 R55.2@2953.51,5867.48
NetJ15_1: J15.1 R63.2 R66.1 U9.6 | length 288.7
  Top Layer w8: U9.6@4474.55,5392.67 4474.55,5481.66 cw(c4492.31,5481.66) 4474.75,5484.32 cw(c4492.31,5481.66) R63.2@4479.75,5494.22 4479.75,5547.24 J15.1@4511.75,5579.24 4507.75,5583.24 4507.75,5622.03 4520.33,5634.61 R66.1@4520.33,5659.9
NetJ15_2: J15.2 R64.2 | length 98.7
  Top Layer w8: R64.2@4390.76,5669.24 4390.76,5666.74 4411.75,5645.75 J15.2@4411.75,5579.24
NetJ19_9: J19.9 R89.2 | length 94.2
  Top Layer w12: J19.9@1435.84,6288.43 J19.9@1435.9,6288.37 ; R89.2@1529.94,6288.37 R89.2@1530,6288.31
  Top Layer w18: J19.9@1435.9,6288.37 R89.2@1529.94,6288.37
NetJ20_9: J20.9 R90.2 | length 94
  Top Layer w18: J20.9@2253.83,6288.43 R90.2@2347.87,6288.43
NetLED1_1: LED1.1 R37.2 | length 41
  Top Layer w15: R37.2@3937.5,3060 LED1.1@3978.47,3060
NetLED2_1: LED2.1 R38.2 | length 41
  Top Layer w15: R38.2@3937.5,3153.27 LED2.1@3978.47,3153.27
NetLED3_1: LED3.1 R39.2 | length 41
  Top Layer w15: R39.2@3937.5,3246.54 LED3.1@3978.47,3246.54
NetLED4_2: LED4.2 R92.1 | length 68.5
  Top Layer w15: LED4.2@910.08,4977.52 R92.1@978.55,4977.52
NetLED5_2: LED5.2 R96.1 | length 68.5
  Top Layer w15: LED5.2@910.08,4851.52 R96.1@978.55,4851.52
NetLED6_2: LED6.2 R99.1 | length 308.2
  Top Layer w12: v1(4721.53,1187.81) LED6.2@4721.53,1228.57
  Top Layer w20: R99.1@4826.96,1307.68 v1(4826.96,1339.6)
  Layer-2 w12: v1(4721.53,1187.81) 4721.53,1302.53 4758.6,1339.6 v1(4826.96,1339.6)
NetLED7_2: LED7.2 R100.1 | length 60.6
  Top Layer w10: LED7.2@4726.37,1298.02 R100.1@4787,1298.02
NetLED8_2: LED8.2 R101.1 | length 305.5
  Top Layer w10: 2702.53,1309 v1(2702.53,1340.93)
  Top Layer w12: v1(2595.53,1187.81) LED8.2@2595.53,1230.54
  Layer-2 w12: v1@2597.06,1189.74 2597.06,1296.83 2641.16,1340.93 v1(2702.53,1340.93)
NetLED9_2: LED9.2 R102.1 | length 60.6
  Top Layer w10: LED9.2@2600.37,1300 R102.1@2661,1300
NetLED10_2: LED10.2 R114.1 | length 295.5
  Top Layer w12: v1(3655.53,1190.81) LED10.2@3655.53,1229.89
  Top Layer w20: 3760.96,1309 v1(3760.96,1340.93)
  Bottom Layer w12: v1@3655.49,1189.74 3655.49,1286.06 3710.35,1340.93 v1(3760.96,1340.93)
NetLED11_2: LED11.2 R115.1 | length 60.6
  Top Layer w10: LED11.2@3660.37,1299.35 R115.1@3721,1299.35
NetLED12_2: LED12.2 R116.1 | length 309.2
  Top Layer w10: R116.1@1635.53,1300 v1(1635.53,1331.93)
  Top Layer w12: v1(1529.53,1186) LED12.2@1529.53,1230.54
  Layer-2 w12: v1@1530.06,1180.74 1530.06,1291.06 1570.93,1331.93 v1(1635.53,1331.93)
NetLED13_2: LED13.2 R117.1 | length 82.8
  Top Layer w10: LED13.2@1529.53,1288 1529.53,1295.16 1534.37,1300 R117.1@1595,1300
  Top Layer w12: LED13.2@1531.53,1288 LED13.2@1531.53,1296.16
NetR8_1: R8.1 U1.18 | length 95
  Top Layer w12: R8.1@4957.83,4141.6 cw(c4983.96,4115.46) 4983.96,4152.43 U1.18@5047.97,4152.43 U1.18@5046.6,4151.06
NetR9_1: R9.1 U1.15 | length 97.5
  Top Layer w12: R9.1@4957.83,4256.86 ccw(c5024.61,4323.64) 5024.61,4229.2 U1.15@5047.97,4229.2
NetR10_1: R10.1 U1.16 | length 94.5
  Top Layer w12: R10.1@4957.83,4216.77 ccw(c4989.61,4248.56) 4989.61,4203.61 U1.16@5047.97,4203.61 U1.16@5047.39,4204.19
NetR11_1: R11.1 U1.17 | length 90.1
  Top Layer w12: R11.1@4957.83,4178.02 U1.17@5047.97,4178.02
NetR12_1: R12.1 U3.18 | length 101
  Top Layer w12: R12.1@4957.39,2714.87 ccw(c4957.39,2733.91) 4970.85,2720.45 4981.52,2731.13 cw(c5021.92,2690.73) 5021.92,2747.86 U3.18@5047.97,2747.86
NetR13_1: R13.1 U3.15 | length 93.3
  Top Layer w12: R13.1@4957.39,2834.63 ccw(c4981.52,2858.77) 4981.52,2824.63 U3.15@5047.97,2824.63
NetR14_1: R14.1 U3.16 | length 91.7
  Top Layer w12: R14.1@4957.39,2794.71 cw(c4967.84,2784.26) 4967.84,2799.04 U3.16@5047.97,2799.04
NetR15_1: R15.1 U3.17 | length 95.6
  Top Layer w12: R15.1@4957.39,2754.79 cw(c5002.43,2709.75) 5002.43,2773.45 U3.17@5047.97,2773.45
NetR40_2: R40.2 U7.7 | length 40.8
  Top Layer w10: U7.7@3696.77,5460.58 R40.2@3737.59,5460.58
NetR41_2: R41.2 U8.7 | length 40.8
  Top Layer w10: U8.7@2940.69,5460.37 R41.2@2981.51,5460.37
NetR42_2: R42.2 U7.9 | length 41.8
  Top Layer w10: U7.9@3671.18,5574.25 cw(c3724.42,5574.25) R42.2@3686.78,5611.9
NetR43_2: R43.2 U8.9 | length 45.3
  Top Layer w10: U8.9@2915.1,5570.61 2915.1,5574.04 cw(c2968.34,5574.04) R43.2@2930.69,5611.69
NetR44_1: R44.1 U7.4 | length 88.6
  Top Layer w10: R44.1@3620,5371.98 U7.4@3620,5460.58
NetR45_1: R45.1 U7.1 | length 91.2
  Top Layer w10: R45.1@3514.08,5377.3 cw(c3586.13,5377.3) 3528.86,5421.01 cw(c3586.13,5377.3) 3535.18,5428.25 ccw(c3515.9,5447.53) 3543.17,5447.53 U7.1@3543.23,5460.58
  Top Layer w12: U7.1@3543.23,5460.58 U7.1@3543.23,5460.58
NetR46_1: R46.1 U8.4 | length 88.6
  Top Layer w10: R46.1@2863.92,5371.77 U8.4@2863.92,5460.37
NetR47_1: R47.1 U8.1 | length 96.4
  Top Layer w10: R47.1@2757.99,5371.77 2757.99,5377.1 cw(c2830.04,5377.1) 2772.77,5420.81 cw(c2830.04,5377.1) 2779.1,5428.04 ccw(c2759.81,5447.33) 2787.08,5447.33 U8.1@2787.14,5460.37
NetR56_2: R56.2 R58.1 U9.1 | length 90.6
  Top Layer w12: R56.2@4386.98,5237.75 4380.26,5244.47 R58.1@4380.26,5282.43 U9.1@4423.35,5282.43
NetR57_2: R57.2 R61.1 U9.4 | length 92.8
  Top Layer w8: R61.1@4547.76,5237.75 ccw(c4546.78,5238.73) R61.1@4548.16,5238.73
  Top Layer w12: U9.4@4500.15,5282.43 R57.2@4548.16,5282.43 R61.1@4548.16,5238.73
NetR62_1: R62.1 R64.1 R65.1 U9.7 | length 321.9
  Top Layer w8: U9.7@4448.95,5392.67 4448.95,5482.79 ccw(c4432.94,5482.79) R62.1@4444.26,5494.11 4444.26,5528.26 4455.28,5539.28 R64.1@4455.28,5664.72 ; R64.1@4450.76,5669.24 R64.1@4455.28,5664.72 ; R65.1@4490.97,5659.9 4460.1,5659.9 R64.1@4455.28,5664.72
NetR67_2: R67.2 U10.7 | length 58.5
  Top Layer w12: U10.7@5075.76,5408.24 R67.2@5075.76,5466.74
NetR68_2: R68.2 U10.8 | length 58.5
  Top Layer w12: U10.8@5025.76,5408.24 R68.2@5025.76,5466.74